# Altium PCB MultiVibrateur.PcbDoc
Units mm, origin at the board's own origin, x right, y up, seen from the top; angles counter-clockwise.
Board outline 28.83 x 20.83 mm, 2 copper layers (Top Layer, Bottom Layer); 9 components, 6 nets, 20 pads, 2 vias.
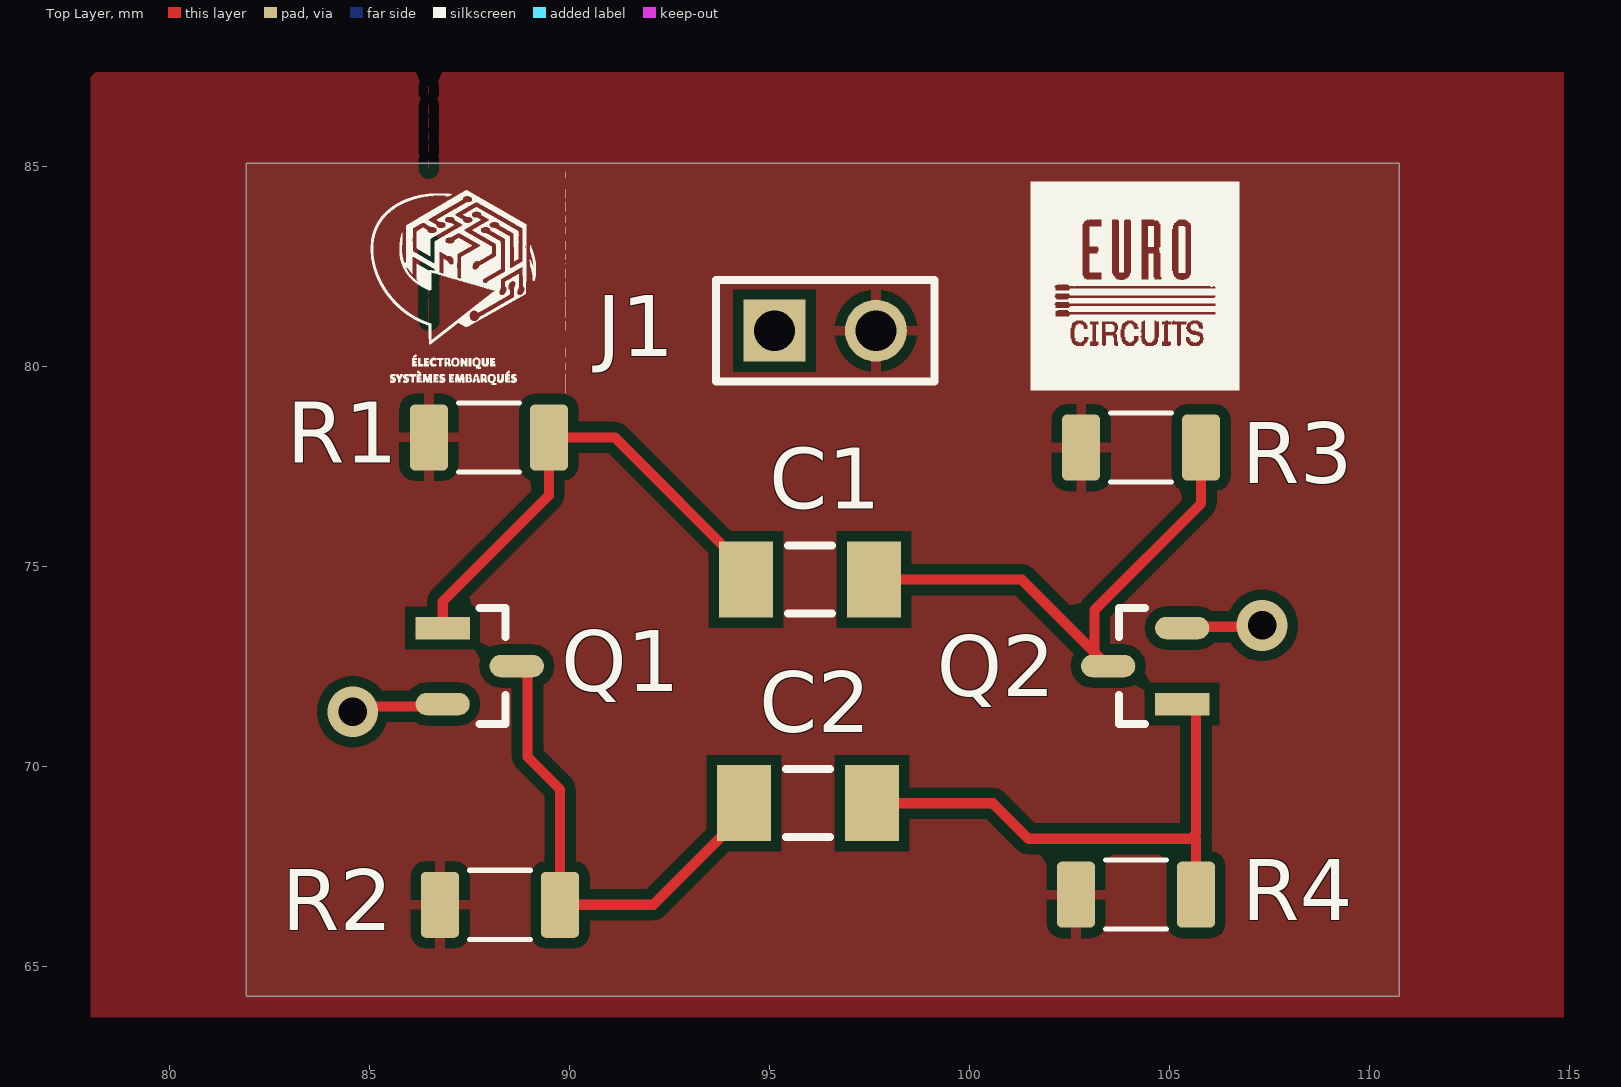
[diagram p0: Top Layer view]
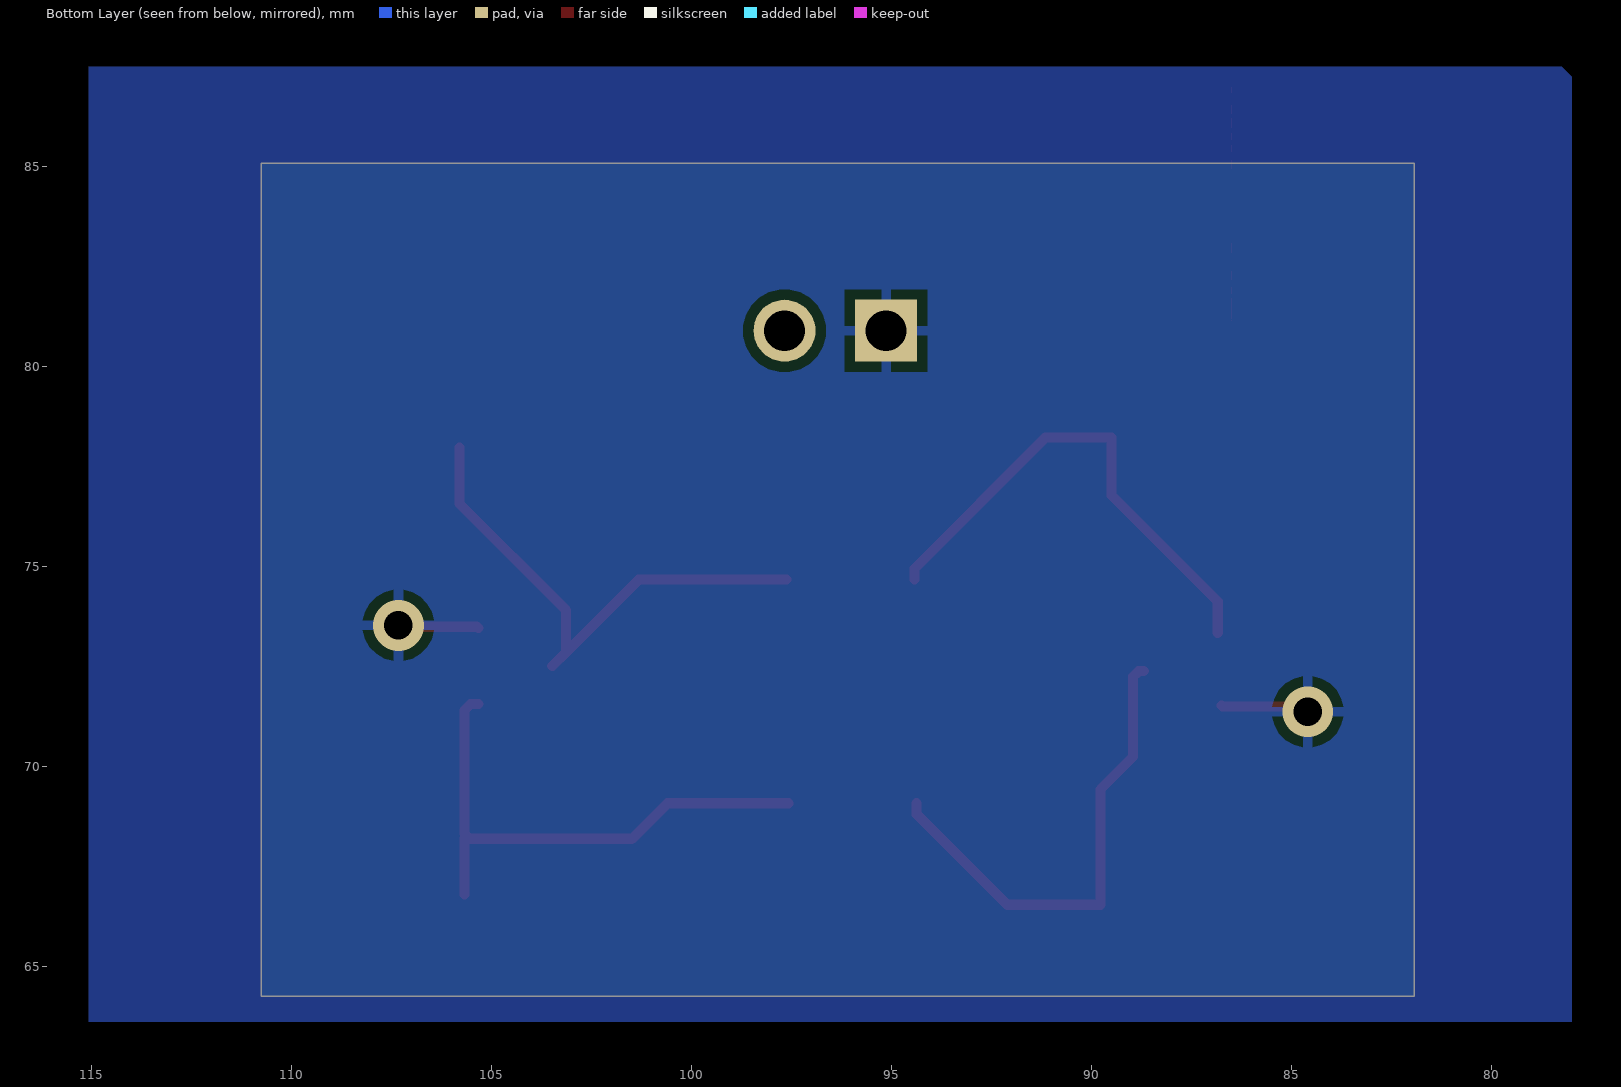
[diagram p1: Bottom Layer view, seen from below]

## Layer stack, top to bottom
Top Solder: solder mask 0.0102, Solder Resist, Dk 3.5
Top Layer: signal copper 0.0356
Dielectric 1: dielectric 0.32, FR-4, Dk 4.8
Bottom Layer: signal copper 0.0356
Bottom Solder: solder mask 0.0102, Solder Resist, Dk 3.5

## Board outline
81.915,64.262 81.915,85.09 110.744,85.09 110.744,64.262

## Design rules (kind name [scope] priority, off if disabled: settings)
Clearance [All] p1: gap=0.254 ignorepadtopadclearanceinfootprint=FALSE
PolygonConnect [All] p1: connectstyle=Relief reliefconductorwidth=0.254 reliefentries=4 polygonreliefangle="90 Angle" airgapwidth=0.254
RoutingVias [All] p1: holewidth=0.711 width=1.27 viastyle="Through Hole" minholewidth=0.711 minwidth=1.27 maxholewidth=0.711 maxwidth=1.27
SolderMaskExpansion [All] p1: expansion=0 istentingtop=FALSE
SupplyNets "Schematic Supply Nets_1" [InNet('12V')] p1: voltage=12.00
SupplyNets "Schematic Supply Nets" [InNet('GND')] p2: voltage=0.000
Width [All] p1: maxlimit=0.254 minlimit=0.254 preferedwidth=0.254
30 further rules are at their usual default settings.

## Classes and differential pairs
net class Power: GND

## Components (designator, comment, footprint, x,y, rotation, side; value= is the part's Value field where it differs from the comment)
C1 "22nF" CAPACITOR_1206 96.012,74.676 r0 top value=100nF
C2 "22nF" CAPACITOR_1206 95.961,69.088 r0 top value=100nF
J1 "2 Pins header" HEADER_2PIN_2_54 95.123,80.899 r0 top
Q1 "Transistor" TRANSISTOR_BC847 87.757,72.517 r0 top
Q2 "Transistor" TRANSISTOR_BC847 104.394,72.517 r180 top
R1 "100k" RESISTOR_1206 87.987,78.232 r180 top
R2 "1k" RESISTOR_1206 88.265,66.548 r180 top
R3 "1k" RESISTOR_1206 104.291,77.978 r180 top
R4 "100k" RESISTOR_1206 104.164,66.802 r180 top

## Footprints (in the part's own frame and the unit in brackets; to place one, negate y for a bottom-side part, rotate by r counter-clockwise, add the part's x,y. Pads: shape width x height; smd on the part's side, far side on the other; paste and mask are expansions set on the pad)
CAPACITOR_1206 [mm] "Chip Capacitor, Body 3.2x1.6mm, Height 1.7mm, IPC Low Density"
  rect 1.35x1.9 smd: 1(-1.6,0) 2(1.6,0)
  silkscreen extent -0.55,-0.85 0.55,0.85, body extent -1.7,-0.9 1.7,0.9, height 1.7
HEADER_2PIN_2_54 [mm] ".025 SQ Post Terminal Strip Assembly, 1x2 Pins, Vertical, 2.54mm Pitch, Male"
  rect 1.55x1.55 hole 1.02: 1(0,0)
  round 1.55 hole 1.02: 2(2.54,0)
  silkscreen extent -1.46,-1.27 4,1.27, body extent -1.4,-1.27 3.81,1.27, height 8.38
RESISTOR_1206 [mm]
  rrect25% 0.95x1.65 smd: 1(-1.5,0) 2(1.5,0)
  silkscreen extent -0.76,-0.86 0.76,0.86, body extent -1.6,-0.8 1.6,0.8, height 0.55
TRANSISTOR_BC847 [mm]
  rect 1.355x0.562 smd paste+0 mask+0: 1(-0.925,0.95)
  rrect100% 1.355x0.562 smd paste+0 mask+0: 2(-0.925,-0.95) 3(0.925,0)
  silkscreen extent 0,-1.45 0.65,1.45, body extent -1.85,-1.7 1.85,1.7, height 0.25

## Part data
C1 C2: library part Capacitor, Case-EIA=1206, Case-Metric=3216, Rated Voltage="100 V", Tolerance=Â±5%, Max Thickness="1.7 mm", Technology=SMT
J1: Manufacturer=Samtec, PartNumber=TSW-102-26-F-S, Temperature Range="-55 to 125 degC", ComponentLink1Description="Manufacturer URL", ComponentLink1URL=http://www.samtec.com, ComponentLink2Description=Datasheet, ComponentLink2URL=http://www.samtec.com/documents/webfiles/pdf/TSW_TH.PDF, ComponentLink3Description="Package Specification", ComponentLink3URL=http://www.samtec.com/documents/webfiles/cpdf/TSW-XXX-XX-XXX-X-XX-XXX-MKT.pdf, DatasheetVersion=F-214, Mounting Technology=Through-hole, Orientation=Vertical, PackageDescription=".025[0.64] SQ. Post Terminal Strip Assembly", PackageReference=TSW-102-26-XX-S, PackageVersion="DM, 8/1988", Pitch="2.54 mm", RoHS=True
R1 R2 R3 R4: library part Resistor
Q1 Q2: RoHS Compliant=Yes

## Via types
v1: diameter 1.27, hole 0.711, Top Layer to Bottom Layer, 2 vias

## Nets (pads, with @x,y where several pads share a name; then routed paths per layer and width w, separated by ;. In a path a pad name is that pad's centre, name@x,y a point inside that pad or via, vN(x,y) a via of type N, cw(c..) or ccw(c..) an arc to the next point about the centre after c; other vN are vias at no path point)
12V: J1.2 R1.2 R2.2 R3.2 R4.2
GND: J1.1 Q1.2 Q2.2 | length 4.2
  Top Layer w0.254: v1(84.582,71.374) 84.716,71.508 86.711,71.508 Q1.2@86.738,71.534 ; Q2.2 105.352,73.5 107.282,73.5 v1(107.315,73.533)
NetC1_1: C1.1 Q1.1 R1.1 | length 12.6
  Top Layer w0.254: Q1.1@86.832,73.34 86.832,74.132 89.487,76.787 R1.1 91.131,78.232 94.412,74.951 C1.1
NetC1_2: C1.2 Q2.3 R3.1 | length 13
  Top Layer w0.254: C1.2 101.31,74.676 103.124,72.862 ; Q2.3 103.124,72.862 ; R3.1 105.791,76.581 103.124,73.914 103.124,72.862
NetC2_1: C2.1 Q1.3 R2.1 | length 12.2
  Top Layer w0.254: Q1.3@88.682,72.39 88.809,72.39 88.952,72.248 88.952,70.246 89.765,69.433 R2.1 92.096,66.548 94.361,68.813 C2.1
NetC2_2: C2.2 Q2.1 R4.1 | length 13.4
  Top Layer w0.254: C2.2 100.584,69.088 101.473,68.199 105.537,68.199 105.664,68.326 105.664,71.413 105.51,71.567 Q2.1 ; R4.1 105.664,68.199

## Polygon pours and split planes (outlines as drawn)
GND on Bottom Layer "GND_L02_P001" (solid, pour order 1): 77.978,87.249 78.232,87.503 115.062,87.503 115.062,63.627 77.978,63.627
12V on Top Layer "12V_L01_P002" (solid, pour order 2): 114.861,87.364 114.861,63.742 78.031,63.742 78.031,87.237 78.158,87.364 78.031,87.237 78.158,87.364

## Other copper
Top Layer:
  region: 86.485,81.153 86.485,81.155 86.487,81.155 86.487,81.153
  region: 86.485,85.419 86.485,85.546 86.487,85.546 86.487,85.374 86.485,85.374 86.485,85.417
  region: 86.485,85.155 86.485,85.172 86.487,85.172 86.487,84.95 86.485,84.95 86.485,85.153
  region: 86.487,85.742 86.487,85.666 86.485,85.666 86.485,85.85 86.487,85.85 86.487,85.744
  region: 86.487,86.913 86.487,86.842 86.485,86.842 86.485,86.995 86.487,86.995 86.487,86.915
  region: 86.487,83.038 86.487,82.849 86.485,82.849 86.485,83.087 86.487,83.087 86.487,83.04
  region: 86.485,86.493 86.485,86.536 86.487,86.536 86.487,86.305 86.485,86.305 86.485,86.491
  region: 86.487,81.52 86.487,81.2 86.485,81.2 86.485,81.716 86.487,81.716 86.487,81.523
  region: 86.487,81.937 86.487,81.813 86.485,81.813 86.485,81.985 86.487,81.985 86.487,81.94
  region: 86.487,86.081 86.487,85.961 86.485,85.961 86.485,86.215 86.487,86.215 86.487,86.083
  region: 86.487,82.211 86.487,82.157 86.485,82.157 86.485,82.39 86.487,82.39 86.487,82.213

## Silkscreen, mask and mechanical layers (free items; w line width, h text height)
Top Overlay:
  drawing of 57 lines, arcs and shapes, not listed
Mechanical 1:
  lines w0.006: 81.915,64.262 110.744,64.262 110.744,85.09 81.915,85.09 81.915,64.262
  lines w0.254: 81.915,64.262 110.744,64.262 110.744,85.09 81.915,85.09 81.915,64.262